# Altium PCB PCB_HDMI_To_FPC-v1.0.PcbDoc (part 1 of 3)
Units mil, origin at the board's own origin, x right, y up, seen from the top; angles counter-clockwise.
Board outline 2043 x 1400 mil, 2 copper layers (Top Layer, Bottom Layer), stack 61.811 mil thick; 121 components, 92 nets, 483 pads, 226 vias.
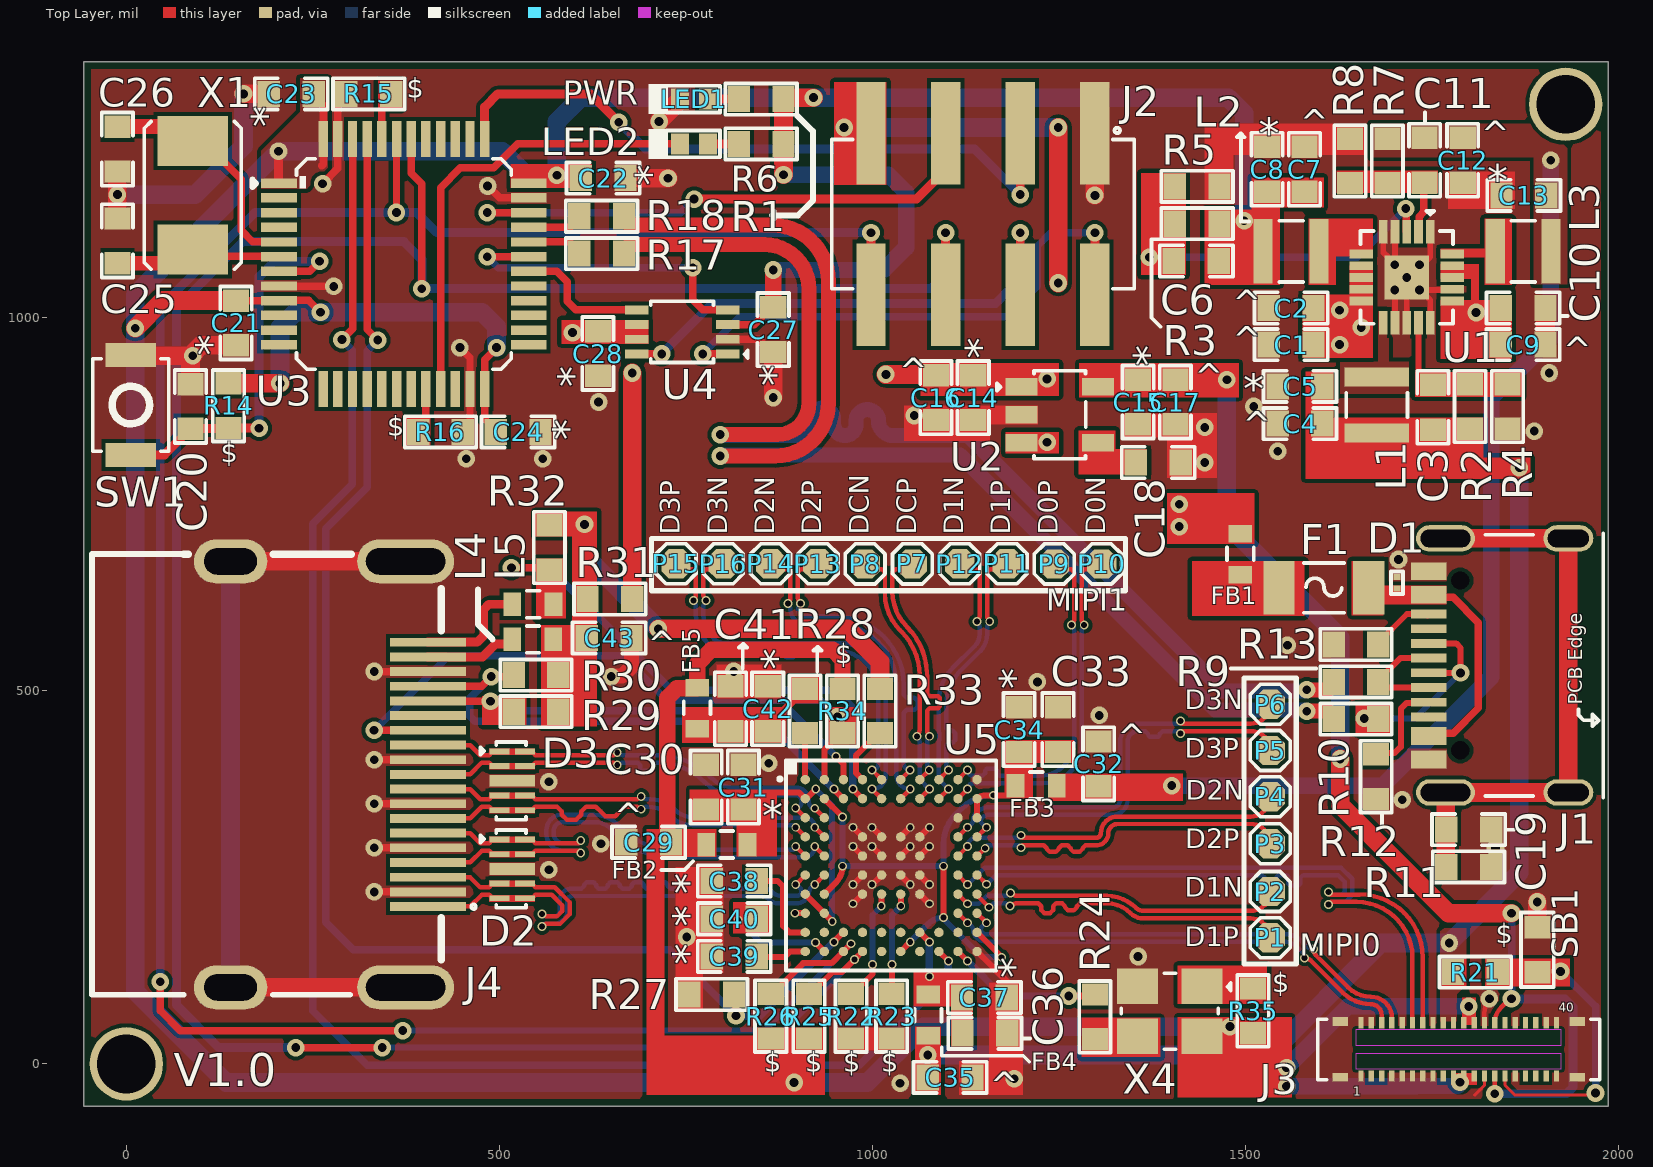
[diagram p0: Top Layer view]
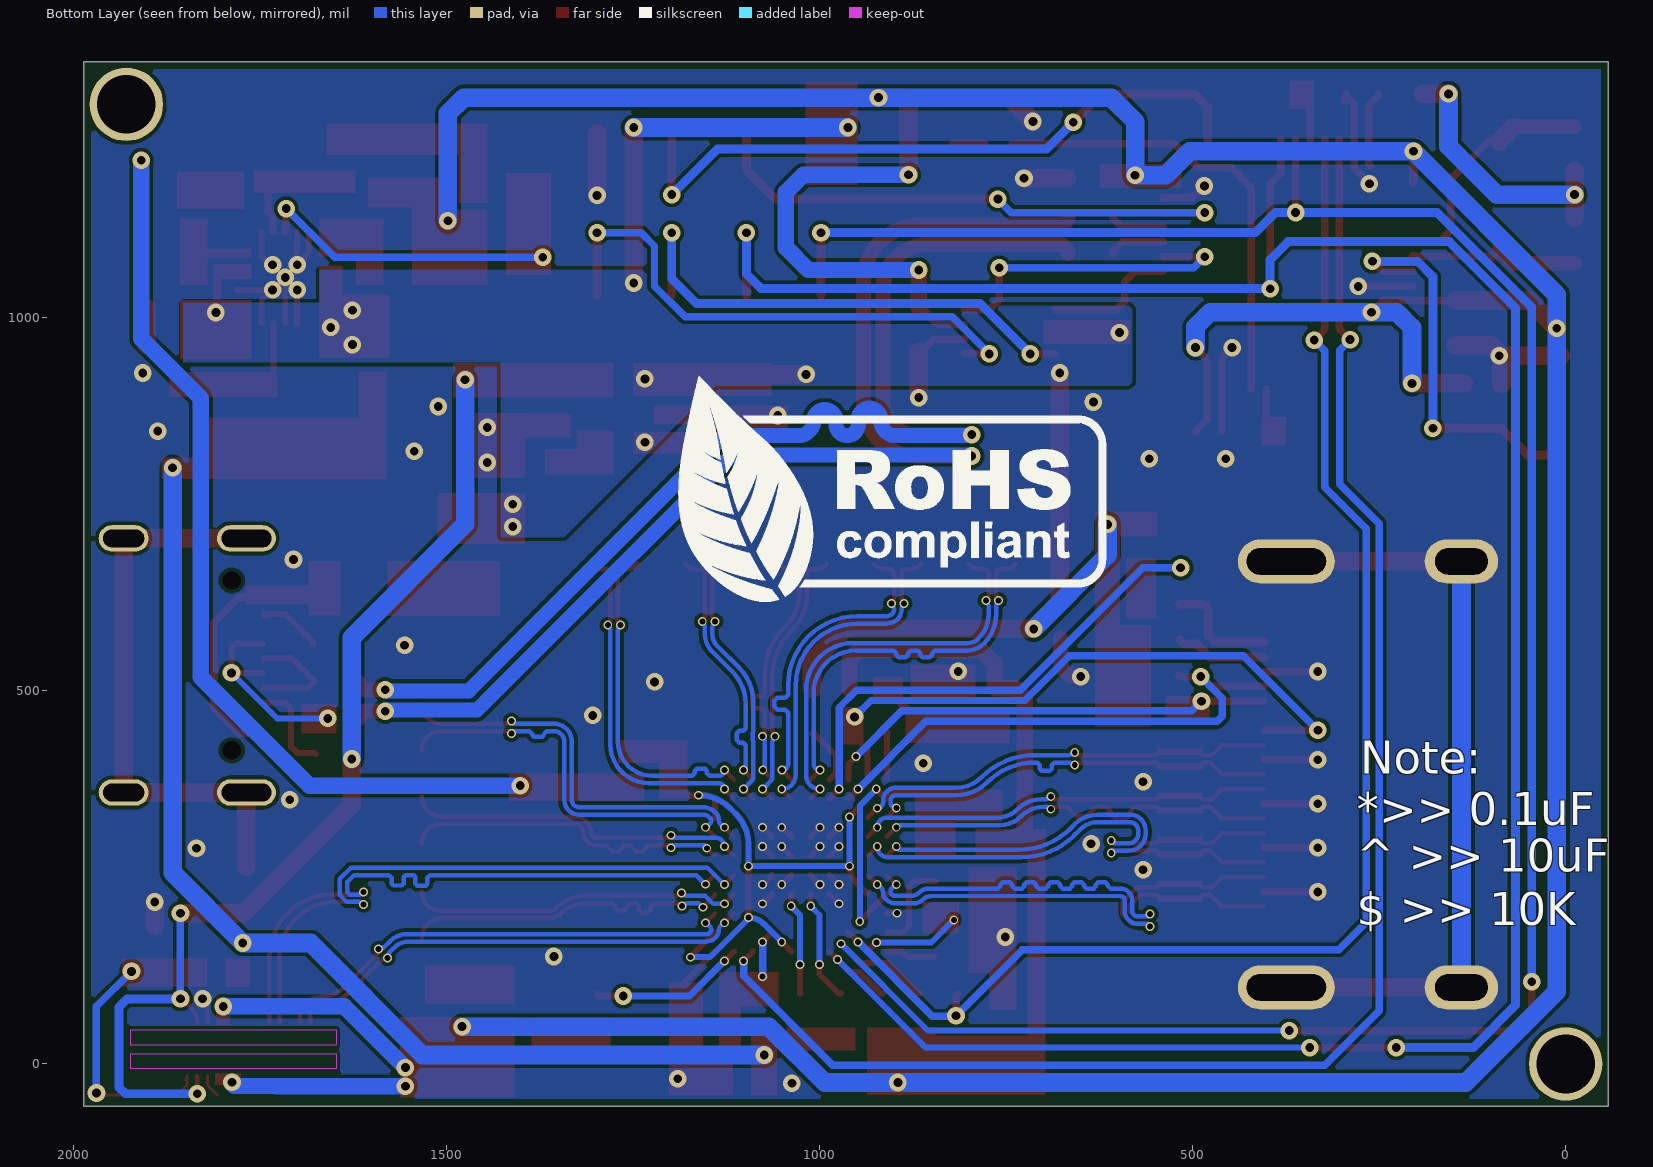
[diagram p1: Bottom Layer view, seen from below]
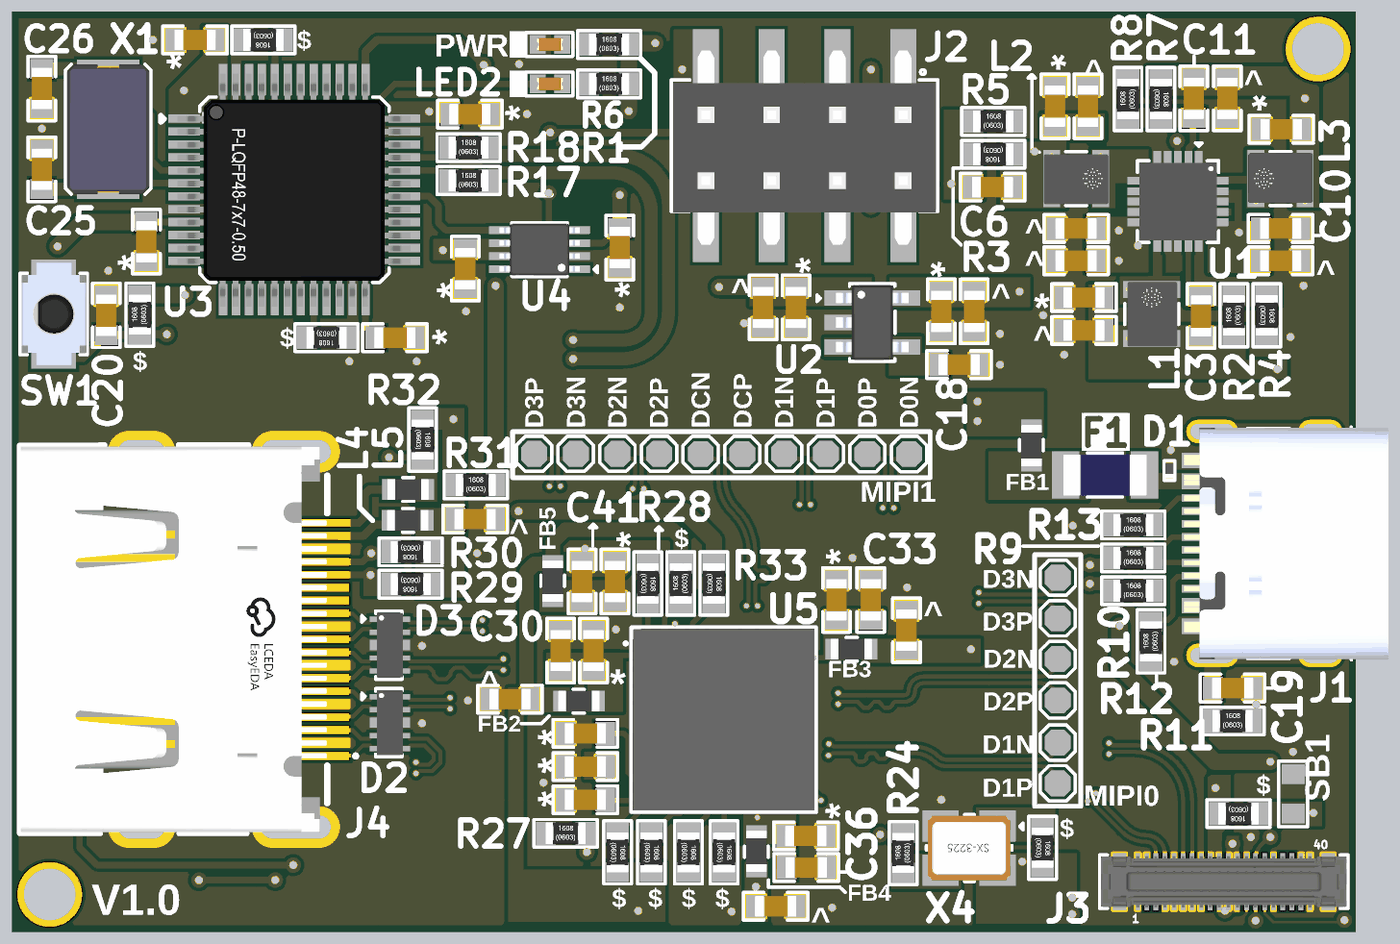
[diagram p3: 3D render of the assembled board from above, using the file's embedded part models]

## Layer stack, top to bottom
Top Solder: solder mask 0.394, Solder Resist, Dk 3.5
Top Layer: signal copper 1.378
Core: core 59.055, FR-4, Dk 4.8
Bottom Layer: signal copper 1.378
Bottom Solder: solder mask 0.394, Solder Resist, Dk 3.5

## Board outline
-57,-57 -57,1343 1986,1343 1986,-57

## Design rules (kind name [scope] priority, off if disabled: settings)
BoardOutlineClearance [All] p1: gap=0 ignorepadtopadclearanceinfootprint=FALSE except(10: Poly-OutlineEdge)
Clearance [All] p1: gap=5 ignorepadtopadclearanceinfootprint=FALSE except(3.5: SMDPad-SMDPad; 4: Arc-Arc Arc-Track Arc-SMDPad Arc-Via Track-Track Track-SMDPad Track-Via; 7: Arc-THPad Arc-Text Track-THPad Track-Text SMDPad-Text THPad-THPad THPad-Via THPad-Text Via-Text Fill-Text Poly-Text Region-Text Text-Text)
ComponentClearance [All] p1: gap=3 collisioncheckmode=3 verticalgap=3 showdistances=FALSE
DiffPairsRouting DiffPairsRouting_HDMI [InDifferentialPairClass('HDMI_Lines')] p1: maxlimit=4 minlimit=4 mostfreqgap=4 toplayer_minwidth=6 toplayer_maxwidth=6 toplayer_prefwidth=6 bottomlayer_minwidth=6 bottomlayer_maxwidth=6 bottomlayer_prefwidth=6 impedanceprofiledriven=TRUE impedanceprofileid={F10A205E-B23D-4947-85CF-815778E6CB3A} impedanceprofilevalue=100.000000 maxuncoupledlength=500
DiffPairsRouting DiffPairsRouting_MIPI [InDifferentialPairClass('MIPI_Lines')] p2: maxlimit=4 minlimit=4 mostfreqgap=4 toplayer_minwidth=6 toplayer_maxwidth=6 toplayer_prefwidth=6 bottomlayer_minwidth=6 bottomlayer_maxwidth=6 bottomlayer_prefwidth=6 impedanceprofiledriven=TRUE impedanceprofileid={F10A205E-B23D-4947-85CF-815778E6CB3A} impedanceprofilevalue=100.000000 maxuncoupledlength=500
DiffPairsRouting DiffPairsRouting_USB [InDifferentialPairClass('USB_Lines')] p3: maxlimit=6 minlimit=6 mostfreqgap=6 toplayer_minwidth=20 toplayer_maxwidth=20 toplayer_prefwidth=20 bottomlayer_minwidth=20 bottomlayer_maxwidth=20 bottomlayer_prefwidth=20 impedanceprofiledriven=TRUE impedanceprofileid={84B6C6F7-BC67-4999-83A6-74B9FB0A56AE} impedanceprofilevalue=90.000000 maxuncoupledlength=500
HoleSize [All] p1: absolutevalues=TRUE maxlimit=1000 minlimit=1 maxpercent=80.000 minpercent=20.000
HoleToHoleClearance [All] p1: gap=1 allowstackedmicrovias=TRUE
MatchedLengths "Schematic Matched Net Lengths_3" [InNetClass('HDMI')] p1: tolerance=5 checknetsindiffpair=TRUE checkdiffpairvsdiffpair=FALSE checkxsignals=FALSE checkothers=FALSE
MatchedLengths "Schematic Matched Net Lengths_2" [InNetClass('MIPI')] p2: tolerance=15 checknetsindiffpair=TRUE checkdiffpairvsdiffpair=FALSE checkxsignals=FALSE checkothers=FALSE
MatchedLengths "Schematic Matched Net Lengths" [InNetClass('USB')] p3: tolerance=50 checknetsindiffpair=TRUE checkdiffpairvsdiffpair=FALSE checkxsignals=FALSE checkothers=FALSE
MaxMinImpedance "Schematic Impedance Constraint_3" [InNetClass('HDMI')] p1: minimum=95.00 maximum=100.0
MaxMinImpedance "Schematic Impedance Constraint_2" [InNetClass('MIPI')] p2: minimum=95.00 maximum=100.0
MaxMinImpedance "Schematic Impedance Constraint" [InNetClass('USB')] p3: minimum=85.00 maximum=90.00
MinimumSolderMaskSliver [All] p1: minsoldermaskwidth=1
PolygonConnect [All] p1: connectstyle=Direct reliefconductorwidth=10 reliefentries=4 polygonreliefangle="90 Angle" airgapwidth=10
RoutingVias [All] p1: holewidth=11.81 width=23.62 viastyle="Through Hole" minholewidth=7.87 minwidth=11.81 maxholewidth=11.81 maxwidth=23.62
SilkToSilkClearance [All] p1: silktosilkclearance=0
SilkToSolderMaskClearance [IsPad] p1: minsilkscreentomaskgap=0 clearancetoexposedcopper=TRUE
SolderMaskExpansion SolderMaskExpansion_1 [IsVia] p1: expansion=4 istentingtop=TRUE
SolderMaskExpansion [Not IsVia] p2: expansion=4 istentingtop=FALSE
UnRoutedNet [All] p1: checkbadconnections=TRUE
Width [All] p1: maxlimit=100 minlimit=4 preferedwidth=10 minimp=50.000000 maximp=50.000000 favimp=50.000000
22 further rules are at their usual default settings.

## Classes and differential pairs
differential pair class MIPI_Lines: MIPI0_D0 MIPI0_D1 MIPI0_D2 MIPI0_D3 MIPI0_DC MIPI1_D0 MIPI1_D1 MIPI1_D2 MIPI1_D3 MIPI1_DC
differential pair class HDMI_Lines: HDMIC HDMID0 HDMID1 HDMID2
net class MIPI: MIPI0_D0_N MIPI0_D0_P MIPI0_D1_N MIPI0_D1_P MIPI0_D2_N MIPI0_D2_P MIPI0_D3_N MIPI0_D3_P MIPI0_DC_N MIPI0_DC_P MIPI1_D0_N MIPI1_D0_P MIPI1_D1_N MIPI1_D1_P MIPI1_D2_N MIPI1_D2_P MIPI1_D3_N MIPI1_D3_P MIPI1_DC_N MIPI1_DC_P
net class HDMI: HDMIC_N HDMIC_P HDMID0_N HDMID0_P HDMID1_N HDMID1_P HDMID2_N HDMID2_P
differential pair class USB_Lines: USB
net class USB: USB_N USB_P
component class U_Power_Section: C1 C2 C3 C4 C5 C6 C7 C8 C9 C10 C11 C12 C13 C14 C15 C16 C17 C18 C19 D1 F1 FB1 J1 L1 L2 L3 LED1 LED2 R1 R2 R3 R4 R5 R6 R7 R8 R9 R10 R11 R12 R13 U1 U2
component class U_HDMI_to_MIPI_Section: C29 C30 C31 C32 C33 C34 C35 C36 C37 C38 C39 C40 C41 C42 FB2 FB3 FB4 FB5 J3 P1 P2 P3 P4 P5 P6 P7 P8 P9 P10 P11 P12 P13 P14 P15 P16 R21 R22 R23 R24 R25 R26 R27 R28 R34 R35 SB1 U5 X4
component class U_Controller_Section: C20 C21 C22 C23 C24 C25 C26 C27 C28 J2 R14 R15 R16 R17 R18 SW1 U3 U4 X1
component class U_Connector_Section: C43 D2 D3 J4 L4 L5 R29 R30 R31 R32 R33
differential pair HDMID2: +HDMID2_P -HDMID2_N
differential pair MIPI1_DC: +MIPI1_DC_P -MIPI1_DC_N
differential pair MIPI1_D3: +MIPI1_D3_P -MIPI1_D3_N
differential pair MIPI1_D2: +MIPI1_D2_P -MIPI1_D2_N
differential pair MIPI1_D1: +MIPI1_D1_P -MIPI1_D1_N
differential pair MIPI1_D0: +MIPI1_D0_P -MIPI1_D0_N
differential pair MIPI0_DC: +MIPI0_DC_P -MIPI0_DC_N
differential pair MIPI0_D3: +MIPI0_D3_P -MIPI0_D3_N
differential pair MIPI0_D2: +MIPI0_D2_P -MIPI0_D2_N
differential pair MIPI0_D1: +MIPI0_D1_P -MIPI0_D1_N
differential pair MIPI0_D0: +MIPI0_D0_P -MIPI0_D0_N
differential pair HDMID1: +HDMID1_P -HDMID1_N
differential pair HDMID0: +HDMID0_P -HDMID0_N
differential pair HDMIC: +HDMIC_P -HDMIC_N
differential pair USB: +USB_P -USB_N

## Components (designator, comment, footprint, x,y, rotation, side; value= is the part's Value field where it differs from the comment)
C1 "10uF" Cap-0603 1561,964 r0 top locked
C2 "10uF" Cap-0603 1561,1013 r0 top locked
C3 "220pF" Cap-0603 1751,880 r270 top locked
C4 "10uF" Cap-0603 1573,858 r0 top locked
C5 "100nF" Cap-0603 1573,908 r0 top locked
C6 "220pF" Cap-0603 1434,1076 r0 top locked
C7 "10uF" Cap-0603 1579,1199 r270 top locked
C8 "100nF" Cap-0603 1529,1199 r270 top locked
C9 "10uF" Cap-0603 1872,964 r180 top locked
C10 "1uF" Cap-0603 1872,1013 r180 top locked
C11 "220pF" Cap-0603 1740,1211 r90 top locked
C12 "10uF" Cap-0603 1791,1211 r90 top locked
C13 "100nF" Cap-0603 1873,1164 r0 top locked
C14 "100nF" Cap-0603 1135,893 r270 top locked
C15 "100nF" Cap-0603 1356,887 r90 top locked
C16 "10uF" Cap-0603 1085,893 r270 top locked
C17 "10uF" Cap-0603 1406,887 r90 top locked
C18 "22nF" Cap-0603 1383,806 r180 top locked
C19 "4.7nF" Cap-0603 1799,314 r180 top locked
C20 "1uF" Cap-0603 86,881 r90 top locked
C21 "100nF" Cap-0603 147,993 r90 top locked
C22 "100nF" Cap-0603 639,1187 r180 top locked
C23 "100nF" Cap-0603 221,1300 r0 top locked
C24 "100nF" Cap-0603 525,847 r180 top locked
C25 "20pF" Cap-0603 -12,1103 r270 top locked
C26 "20pF" Cap-0603 -12,1226 r90 top locked
C27 "100nF" Cap-0603 867,984 r270 top locked
C28 "100nF" Cap-0603 632,952 r270 top locked
C29 "10uF" Cap-0603 700,297 r0 top locked
C30 "10nF" Cap-0603 777,371 r270 top locked
C31 "100nF" Cap-0603 827,371 r270 top locked
C32 "10uF" Cap-0603 1303,402 r270 top locked
C33 "10nF" Cap-0603 1248.64,448.05 r270 top locked
C34 "100nF" Cap-0603 1196.64,448.05 r270 top locked
C35 "10uF" Cap-0603 1104,-18 r180 top locked
C36 "10nF" Cap-0603 1150.64,41.05 r180 top locked
C37 "100nF" Cap-0603 1150,89 r180 top locked
C38 "100nF" Cap-0603 814.64,245.05 r0 top locked
C39 "100nF" Cap-0603 814.64,144.05 r0 top locked
C40 "100nF" Cap-0603 814.64,194.55 r0 top locked
C41 "10nF" Cap-0603 809.64,476.05 r270 top locked
C42 "100nF" Cap-0603 859.64,476.05 r270 top locked
C43 "10uF" Cap-0603 647,571 r180 top locked
D1 "PESD5V0H1BSFYL" DSN0603-2 1703,644.87 r90 top locked
D2 "AZ1045-04F" AZ1045-04F 517.22,261.31 r0 top locked
D3 "AZ1045-04F" AZ1045-04F 517.22,379.31 r0 top locked
F1 "1206L300SLTHYR" "Fuse 1206 (3216 Metric)" 1605,638 r180 top locked
FB1 "120R" "IND-0603 (1608 Metric)" 1493,683 r90 top
FB2 "120R" "IND-0603 (1608 Metric)" 805,294 r180 top locked
FB3 "120R" "IND-0603 (1608 Metric)" 1219.2,373.05 r0 top locked
FB4 "120R" "IND-0603 (1608 Metric)" 1074.64,65.49 r270 top locked
FB5 "120R" "IND-0603 (1608 Metric)" 765,476.56 r90 top locked
J1 "TYPE-C-31-M-12" TYPE-C-31-M-12_ 1839,534 r90 top locked
J2 "2.54-2*4P" C192300 1148,1139 r270 top locked
J3 "BM23FR0.6-40DS-0.35V(895)" BM23FR0.6-40DS-0.35V(895) 1785.66,19.4 r0 top
J4 "HD-A-05H9191N" HD-A-05H9191N 272,388 r270 top locked
L1 "1.5uH" "IND-1008 (2520 Metric)" 1676,883 r270 top locked
L2 "1.5uH" "IND-1008 (2520 Metric)" 1561,1089 r180 top locked
L3 "1.5uH" "IND-1008 (2520 Metric)" 1872,1089 r0 top locked
L4 "10uH" "IND-0603 (1608 Metric)" 544.56,569 r0 top locked
L5 "10uH" "IND-0603 (1608 Metric)" 545,616 r0 top locked
LED1 "Green" LED-0402 760.7,1293 r180 top locked
LED2 "Green" LED-0402 760.7,1233 r180 top locked
P1 "TEST POINT" "Test-point - 0.5mm" 1533,169 r90 top locked
P2 "TEST POINT" "Test-point - 0.5mm" 1533,231 r90 top locked
P3 "TEST POINT" "Test-point - 0.5mm" 1533.09,295 r180 top locked
P4 "TEST POINT" "Test-point - 0.5mm" 1533.09,358 r180 top locked
P5 "TEST POINT" "Test-point - 0.5mm" 1533.02,420 r0 top locked
P6 "TEST POINT" "Test-point - 0.5mm" 1533.09,482 r0 top locked
P7 "TEST POINT" "Test-point - 0.5mm" 1053.46,670 r90 top locked
P8 "TEST POINT" "Test-point - 0.5mm" 990.07,670 r90 top locked
P9 "TEST POINT" "Test-point - 0.5mm" 1243.61,670 r90 top locked
P10 "TEST POINT" "Test-point - 0.5mm" 1307,670 r90 top locked
P11 "TEST POINT" "Test-point - 0.5mm" 1180.32,670.16 r0 top locked
P12 "TEST POINT" "Test-point - 0.5mm" 1116.94,670.16 r0 top locked
P13 "TEST POINT" "Test-point - 0.5mm" 926.78,670.16 r0 top locked
P14 "TEST POINT" "Test-point - 0.5mm" 863.39,670.16 r0 top locked
P15 "TEST POINT" "Test-point - 0.5mm" 736.69,670.2 r180 top locked
P16 "TEST POINT" "Test-point - 0.5mm" 800.08,670.2 r180 top locked
R1 "1K" Res-0603 850.7,1293 r180 top locked
R2 "200K" Res-0603 1801,881 r270 top locked
R3 "68K" RES-0603 1435,1126 r0 top locked
R4 "100K" Res-0603 1851,881 r90 top locked
R5 "15K" RES-0603 1435,1176 r180 top locked
R6 "1K" Res-0603 850.7,1233 r180 top locked
R7 "120K" RES-0603 1690,1210 r90 top locked
R8 "100K" Res-0603 1640,1210 r270 top locked
R9 "0R" Res-0603 1648,512 r180 top locked
R10 "0R" Res-0603 1648,462 r180 top locked
R11 "1M" Res-0603 1799,264 r180 top locked
R12 "5.1k" Res-0603 1675,385 r270 top locked
R13 "5.1k" Res-0603 1648,562 r180 top locked
R14 "10K" Res-0603 137,882 r270 top locked
R15 "10K" Res-0603 325,1300 r0 top locked
R16 "10K" Res-0603 421,847 r0 top locked
R17 "22R" Res-0603 637,1086 r180 top locked
R18 "22R" Res-0603 637,1136 r180 top locked
R21 "10K" Res-0603 1808,123 r0 top locked
R22 "10K" Res-0603 971.3,64.05 r90 top locked
R23 "10K" Res-0603 1025.64,64.05 r90 top locked
R24 "1K" Res-0603 1298,63 r270 top locked
R25 "10K" Res-0603 914.97,64.05 r90 top locked
R26 "10K" Res-0603 863.64,64.05 r90 top locked
R27 "47K" Res-0603 784.64,93.05 r180 top locked
R28 "2K" Res-0603 909.64,473 r90 top locked
R29 "47K" Res-0603 549,472 r0 top locked
R30 "47K" Res-0603 549,521 r0 top locked
R31 "1K" Res-0603 648,623 r180 top locked
R32 "1K" Res-0603 567,692 r90 top locked
R33 "1K" Res-0603 1010,473 r90 top locked
R34 "10K" Res-0603 959.82,473 r270 top locked
R35 "10K" Res-0603 1510,71 r90 top locked
SB1 "Solder Bridge 0603" "Solder Bridge" 1891,153 r270 top locked
SW1 "B3U-1000P" B3U-1000P 6,883 r90 top locked
U1 "EA3036CQBR" 20-QFN(3X3) 1716,1054 r270 top locked
U2 "RT9193-28GB" SOT-23-5 1251,870 r0 top locked
U3 "STM32F103CBT6" "48-LQFP (7x7)_" 372,1072 r0 top locked
U4 "TXB0102DCUR" VSSOP-8(3.1x2.1) 745,981 r180 top locked
U5 "TC358870XBG(NOK)" TC358870XBG 1025.02,265.84 r0 top locked
X1 "8MHz" SMD5032-2P 89,1164 r270 top locked
X4 "40MHz" SMD3225-4P 1398.31,70.46 r180 top locked value=40MHZ

## Footprints (in the part's own frame and the unit in brackets; to place one, negate y for a bottom-side part, rotate by r counter-clockwise, add the part's x,y. Pads: shape width x height; smd on the part's side, far side on the other; paste and mask are expansions set on the pad)
20-QFN(3X3) [mm]
  rect 0.8x0.3 smd: 1(-1.55,0.8) 2(-1.55,0.4) 3(-1.55,0) 4(-1.55,-0.4) 5(-1.55,-0.8) 11(1.55,-0.8) 12(1.55,-0.4) 13(1.55,0) 14(1.55,0.4) 15(1.55,0.8)
  rect 0.3x0.8 smd: 6(-0.8,-1.55) 7(-0.4,-1.55) 8(0,-1.55) 9(0.4,-1.55) 10(0.8,-1.55) 16(0.8,1.55) 17(0.4,1.55) 18(0,1.55) 19(-0.4,1.55) 20(-0.8,1.55)
  rect 1.5x1.5 smd: 21(0,0)
  silkscreen extent -2.26,-1.57 1.58,1.57, body extent -1.5,-1.5 1.5,1.5, height 0.8
"48-LQFP (7x7)_" [mm]
  rect 1.22x0.32 smd: 1(-4.25,2.75) 2(-4.25,2.25) 3(-4.25,1.75) 4(-4.25,1.25) 5(-4.25,0.75) 6(-4.25,0.25) 7(-4.25,-0.25) 8(-4.25,-0.75) 9(-4.25,-1.25) 10(-4.25,-1.75) 11(-4.25,-2.25) 12(-4.25,-2.75) 25(4.25,-2.75) 26(4.25,-2.25) 27(4.25,-1.75) 28(4.25,-1.25) 29(4.25,-0.75) 30(4.25,-0.25) 31(4.25,0.25) 32(4.25,0.75) 33(4.25,1.25) 34(4.25,1.75) 35(4.25,2.25) 36(4.25,2.75)
  rect 0.32x1.22 smd: 13(-2.75,-4.25) 14(-2.25,-4.25) 15(-1.75,-4.25) 16(-1.25,-4.25) 17(-0.75,-4.25) 18(-0.25,-4.25) 19(0.25,-4.25) 20(0.75,-4.25) 21(1.25,-4.25) 22(1.75,-4.25) 23(2.25,-4.25) 24(2.75,-4.25) 37(2.75,4.25) 38(2.25,4.25) 39(1.75,4.25) 40(1.25,4.25) 41(0.75,4.25) 42(0.25,4.25) 43(-0.25,4.25) 44(-0.75,4.25) 45(-1.25,4.25) 46(-1.75,4.25) 47(-2.25,4.25) 48(-2.75,4.25)
  silkscreen extent -5.16,-3.58 3.66,3.58, body extent -4.51,-4.51 4.49,4.49, height 1.43
AZ1045-04F [mm]
  rect 0.675x0.2 smd: 1(-0.437,1) 2(-0.437,0.5) 4(-0.437,-0.5) 5(-0.437,-1) 6(0.437,-1) 6(0.437,-1) 7(0.437,-0.5) 9(0.437,0.5) 10(0.437,1)
  rect 1.55x0.4 smd: 3_8(0,0)
  silkscreen extent -1.08,-1.32 0.47,1.32, body extent -0.5,-1.25 0.5,1.25, height 0.55
B3U-1000P [mm] "SWITCH TACTILE SPST-NO 0.05A 12V"
  rect 0.82x1.72 smd: 1(-1.7,0) 2(1.7,0)
  silkscreen extent -1.57,-1.3 1.57,1.3, body extent -2,-1.26 2,1.24, height 1.6
BM23FR0.6-40DS-0.35V(895) [mm]
  rect 0.18x0.38 smd mask+0.07: 1(-3.325,-0.91) 2(-3.325,0.91) 3(-2.975,-0.91) 4(-2.975,0.91) 5(-2.625,-0.91) 6(-2.625,0.91) 7(-2.275,-0.91) 8(-2.275,0.91) 9(-1.925,-0.91) 10(-1.925,0.91) 11(-1.575,-0.91) 12(-1.575,0.91) 13(-1.225,-0.91) 14(-1.225,0.91) 15(-0.875,-0.91) 16(-0.875,0.91) 17(-0.525,-0.91) 18(-0.525,0.91) 19(-0.175,-0.91) 20(-0.175,0.91) 21(0.175,-0.91) 22(0.175,0.91) 23(0.525,-0.91) 24(0.525,0.91) 25(0.875,-0.91) 26(0.875,0.91) 27(1.225,-0.91) 28(1.225,0.91) 29(1.575,-0.91) 30(1.575,0.91) 31(1.925,-0.91) 32(1.925,0.91) 33(2.275,-0.91) 34(2.275,0.91) 35(2.625,-0.91) 36(2.625,0.91) 37(2.975,-0.91) 38(2.975,0.91) 39(3.325,-0.91) 40(3.325,0.91)
  rect 0.52x0.3 smd mask+0.07: S1(-4.03,-0.95) S2(-4.03,0.95) S3(4.03,0.95) S4(4.03,-0.95)
  Keep-Out Layer region: -3.503,-0.665 3.497,-0.665 3.497,-0.145 -3.503,-0.145
  Keep-Out Layer region: -3.503,0.145 3.497,0.145 3.497,0.665 -3.503,0.665
  silkscreen extent -4.8,-1.03 4.8,1.03, body extent -4.75,-0.99 4.75,0.99, height 0.6
C192300 [mm]
  rect 3.5x1 smd: 1(-2.75,3.81) 2(2.75,3.81) 3(-2.75,1.27) 4(2.75,1.27) 5(-2.75,-1.27) 6(2.75,-1.27) 7(-2.75,-3.81) 8(2.75,-3.81)
  silkscreen extent -2.94,-5.15 2.54,5.15, body extent -3.67,-5.08 3.83,5.08, height 8.5
Cap-0603 [mil]
  rect 30x35 smd mask+2.36: 1(-30,0) 2(30,0)
  silkscreen extent -49,-21 49,21, body extent -32,-16 31,16, height 34
DSN0603-2 [mm]
  rect 0.2x0.24 smd mask+0.055: 1(-0.2,0) 2(0.2,0)
  silkscreen extent -0.38,-0.2 0.38,0.2, body extent -0.3,-0.15 0.3,0.15, height 0.32
"Fuse 1206 (3216 Metric)" [mm] "0.126\" L x 0.062\" W x 0.026\" H (3.20mm x 1.58mm x 0.65mm)"
  rect 1.06x1.82 smd: 1(-1.528,0) 2(1.528,0)
  silkscreen extent -0.68,-0.85 0.68,0.85, body extent -1.6,-0.79 1.6,0.79, height 0.85
HD-A-05H9191N [mm]
  rect 0.3x2.6 smd paste-100 mask+0.051: 1(4.501,3.36) 2(4.001,3.36) 3(3.501,3.36) 4(3.001,3.36) 5(2.5,3.36) 6(2,3.36) 7(1.5,3.36) 8(1,3.36) 9(0.5,3.36) 10(0,3.36) 11(-0.5,3.36) 12(-1,3.36) 13(-1.5,3.36) 14(-2,3.36) 15(-2.5,3.36) 16(-3.001,3.36) 17(-3.501,3.36) 18(-4.001,3.36) 19(-4.501,3.36)
  oval 1.5x3.3 hole 0.9 slot 2.7 at 90 deg paste+0 mask+0.051: S1(-7.251,2.6) S2(7.251,2.6)
  oval 1.5x2.5 hole 0.9 slot 1.8 at 90 deg paste+0 mask+0.051: S3(7.251,-3.36) S4(-7.251,-3.36)
  silkscreen extent -7.5,-8.07 7.5,4.98, body extent -7.45,-8.03 7.45,3.77, height 6.19
"IND-0603 (1608 Metric)" [mm] "0.063\" L x 0.032\" W (1.60mm x 0.80mm)"
  rect 0.6x0.8 smd: 1(-0.7,0) 2(0.7,0)
  silkscreen extent -0.2,-0.46 0.23,0.46, body extent -0.8,-0.4 0.8,0.4, height 0.78
"IND-1008 (2520 Metric)" [mm]
  rect 0.65x2.2 smd: 1(-0.95,0) 2(0.95,0)
  silkscreen extent -0.41,-1.04 0.41,1.04, body extent -1.25,-1 1.25,1, height 1.2
LED-0402 [mm]
  rect 0.62x0.72 smd: 1(-0.475,0) 2(0.475,0)
  silkscreen extent -0.89,-0.51 1.55,0.51, body extent -0.5,-0.25 0.51,0.25, height 0.45
Res-0603 [mil]
  rect 30x35 smd: 1(-30,0) 2(30,0)
  silkscreen extent -48,-21 48,21, body extent -31,-17 31,17, height 18
RES-0603 [mil]
  rect 30x35 smd: 1(-30,0) 2(30,0)
  silkscreen extent -48,-21 48,21, body extent -31,-17 31,17, height 18
SMD3225-4P [mm]
  rect 1.4x1.2 smd: 1(-1.1,-0.85) 2(1.1,-0.85) 3(1.1,0.85) 4(-1.1,0.85)
  silkscreen extent -2.08,-1.3 1.65,1.3, body extent -1.6,-1.25 1.6,1.25, height 0.81
SMD5032-2P [mm]
  rect 1.7x2.4 smd: 1(-1.85,0) 2(1.85,0)
  silkscreen extent -2.51,-1.65 2.51,1.65, body extent -2.5,-1.6 2.5,1.6, height 1.3
"Solder Bridge" [mil] "Solder Bridge ON"
  rect 30x35 smd: 1(-30,0) 2(30,0)
  silkscreen extent -50,-22 50,22
SOT-23-5 [mm]
  rect 1.1x0.6 smd: 1(-1.3,0.95) 2(-1.3,0) 3(-1.3,-0.95) 4(1.3,-0.95) 5(1.3,0.95)
  silkscreen extent -2.13,-1.5 0.88,1.5, body extent -1.4,-1.45 1.4,1.45, height 1.45
TC358870XBG [mm]
  round 0.32 smd paste+0 mask+0.05: A1(-2.925,2.925) A2(-2.275,2.925) A3(-1.625,2.925) A4(-0.975,2.925) A5(-0.325,2.925) A6(0.325,2.925) A7(0.975,2.925) A8(1.625,2.925) A9(2.275,2.925) A10(2.925,2.925) B1(-2.925,2.275) B2(-2.275,2.275) B3(-1.625,2.275) B4(-0.975,2.275) B5(-0.325,2.275) B6(0.325,2.275) B7(0.975,2.275) B8(1.625,2.275) B9(2.275,2.275) B10(2.925,2.275) C1(-2.925,1.625) C2(-2.275,1.625) C9(2.275,1.625) C10(2.925,1.625) D1(-2.925,0.975) D2(-2.275,0.975) D4(-0.975,0.975) D5(-0.325,0.975) D6(0.325,0.975) D7(0.975,0.975) D9(2.275,0.975) D10(2.925,0.975) E1(-2.925,0.325) E2(-2.275,0.325) E4(-0.975,0.325) E5(-0.325,0.325) E6(0.325,0.325) E7(0.975,0.325) E9(2.275,0.325) E10(2.925,0.325) F1(-2.925,-0.325) F2(-2.275,-0.325) F4(-0.975,-0.325) F5(-0.325,-0.325) F6(0.325,-0.325) F7(0.975,-0.325) F9(2.275,-0.325) F10(2.925,-0.325) G1(-2.925,-0.975) G2(-2.275,-0.975) G4(-0.975,-0.975) G5(-0.325,-0.975) G6(0.325,-0.975) G7(0.975,-0.975) G9(2.275,-0.975) G10(2.925,-0.975) H1(-2.925,-1.625) H2(-2.275,-1.625) H9(2.275,-1.625) H10(2.925,-1.625) J1(-2.925,-2.275) J2(-2.275,-2.275) J3(-1.625,-2.275) J4(-0.975,-2.275) J5(-0.325,-2.275) J6(0.325,-2.275) J7(0.975,-2.275) J8(1.625,-2.275) J9(2.275,-2.275) J10(2.925,-2.275) K1(-2.925,-2.925) K2(-2.275,-2.925) K3(-1.625,-2.925) K4(-0.975,-2.925) K5(-0.325,-2.925) K6(0.325,-2.925) K7(0.975,-2.925) K8(1.625,-2.925) K9(2.275,-2.925) K10(2.925,-2.925)
  silkscreen extent -3.84,-3.58 3.58,3.58, body extent -3.5,-3.5 3.5,3.5, height 1
"Test-point - 0.5mm" [mm]
  oct 1x1 smd: 1(0,0)
  silkscreen extent -0.68,-0.68 0.68,0.68
TYPE-C-31-M-12_ [mm]
  rect 0.6x1.2 smd: A1/B12(-3.2,2.375) A4/B9(-2.4,2.375) B1/A12(3.2,2.375) B4/A9(2.4,2.375)
  rect 0.3x1.2 smd: A5(-1.25,2.375) A6(-0.25,2.375) A7(0.25,2.375) A8(1.25,2.375) B5(1.75,2.375) B6(0.75,2.375) B7(-0.75,2.375) B8(-1.75,2.375)
  round 0 hole 0.62 unplated: MH(-2.89,1.305) MH(2.89,1.305)
  oval 0.9x2 hole 0.6 slot 1.7 at 90 deg: S1(4.325,1.805) S4(-4.325,1.805)
  oval 0.9x1.7 hole 0.6 slot 1.4 at 90 deg: S2(4.325,-2.375) S3(-4.325,-2.375)
  silkscreen extent -4.5,-3.57 4.5,0.44, body extent -4.47,-5.01 4.47,2.89, height 3.31
VSSOP-8(3.1x2.1) [mm]
  rect 0.8x0.3 smd: 1(-1.55,0.75) 2(-1.55,0.25) 3(-1.55,-0.25) 4(-1.55,-0.75) 5(1.55,-0.75) 6(1.55,-0.25) 7(1.55,0.25) 8(1.55,0.75)
  silkscreen extent -2.24,-1.04 1.07,1.04, body extent -1.55,-1 1.55,1, height 0.88

## Part data
C1 C2 C4 C7 C9 C12 C16 C17 C29 C32 C35 C43: library part CGA0603X5R106K100JT, "10V 10uF X5R ±10% 0603 Multilayer Ceramic Capacitors MLCC - SMD/SMT ROHS", LCSC Part Number=C6119842, Manufacturer=HRE, Package=0603, ComponentLink1Description=LCSC, ComponentLink1URL=https://www.lcsc.com/product-detail/Multilayer-Ceramic-Capacitors-MLCC-SMD-SMT_HRE-CGA0603X5R106K100JT_C6119842.html, Item Type=Capacitor, Manufacturer Part Number=CGA0603X5R106K100JT
C3 C6 C11: library part CS1608X7R221K500NRB, "50V 220pF X7R ±10% 0603 Multilayer Ceramic Capacitors MLCC - SMD/SMT ROHS", LCSC Part Number=C5255295, Manufacturer="Samwha Capacitors", Package=0603, ComponentLink1Description=LCSC, ComponentLink1URL=https://www.lcsc.com/product-detail/Multilayer-Ceramic-Capacitors-MLCC-SMD-SMT_Samwha-Capacitor-CS1608X7R221K500NRB_C5255295.html, Item Type=Capacitor, Manufacturer Part Number=CS1608X7R221K500NRB
C5 C8 C13 C14 C15 C21 C22 C23 C24 C27 C28 C31 C34 C37 C38 C39 C40 C42: library part CL10B104KA8NNNC, "25V 100nF X7R ±10% 0603 Multilayer Ceramic Capacitors MLCC - SMD/SMT ROHS", LCSC Part Number=C1590, Manufacturer="Samsung Electro-Mechanics", Package=0603, ComponentLink1Description=LCSC, ComponentLink1URL=https://www.lcsc.com/product-detail/Multilayer-Ceramic-Capacitors-MLCC-SMD-SMT_Samsung-Electro-Mechanics-CL10B104KA8NNNC_C1590.html, Item Type=Capacitor, Manufacturer Part Number=CL10B104KA8NNNC
C10 C20: library part CL10A105KO8NNNC, "16V 1uF X5R ±10% 0603 Multilayer Ceramic Capacitors MLCC - SMD/SMT ROHS", LCSC Part Number=C1592, Manufacturer="Samsung Electro-Mechanics", Package=0603, ComponentLink1Description=LCSC, ComponentLink1URL=https://www.lcsc.com/product-detail/Multilayer-Ceramic-Capacitors-MLCC-SMD-SMT_Samsung-Electro-Mechanics-CL10A105KO8NNNC_C1592.html, Item Type=Capacitor, Manufacturer Part Number=CL10A105KO8NNNC
C18: library part FN18X223K250PSG, "25V 22nF X7R 0603 Multilayer Ceramic Capacitors MLCC - SMD/SMT ROHS", LCSC Part no=C2929161, Package=0603, ComponentLink1Description=LCSC, ComponentLink1URL=https://www.lcsc.com/product-detail/Multilayer-Ceramic-Capacitors-MLCC-SMD-SMT_PSA-Prosperity-Dielectrics-FN18X223K250PSG_C2929161.html, Item Type=Capacitor, Manfacuturer=PSA, Manufacturer Prt no=FN18X223K250PSG
C19: library part CC0603JRNPO9BN472, "CAP CER 4700PF 50V C0G/NPO 0603", LCSC Part Number=C576818, Manufacturer=Yageo, Supplier Part Number 1=13-CC0603JRNPO9BN472CT-ND, Category="Ceramic Capacitors", ComponentLink1Description=LCSC, ComponentLink1URL=https://www.lcsc.com/product-detail/Multilayer-Ceramic-Capacitors-MLCC-SMD-SMT_YAGEO-CC0603JRNPO9BN472_C576818.html, Item Type=Capacitor, Manufacturer Part Number=CC0603JRNPO9BN472, Pricing 1="1=0.48000, 10=0.33000, 50=0.23100, 100=0.19800, 500=0.14854, 1000=0.12543 (USD)", RoHS=Yes, RoHS Compliant=Yes, Stock 1=31779, Supplier 1=Digi-Key
C25 C26: library part CC0603JRNPO9BN200, "CAP CER 20PF 50V C0G/NPO 0603", Case Code (Imperial)=0603, Case Code (Metric)=1608, Dielectric=C0G, LCSC Part Number=C105621, Manufacturer=Yageo, Max Operating Temperature=125°C, Min Operating Temperature=-55°C, Package Quantity=4000, Supplier Part Number 1=311-1424-6-ND, Tolerance=5%, Voltage Rating=50V, Capacitance=20pF, Case/Package=0603, ComponentLink1Description=http://www.farnell.com/datasheets/1132289.pdf?src-supplier=Element14, ComponentLink1URL=http://www.farnell.com/datasheets/1132289.pdf?src-supplier=Element14, ComponentLink2Description=http://www.yageo.com/documents/recent/UPY-GP_NP0_16V-to-50V_16.pdf?src-supplier=Digi-Key, ComponentLink2URL=http://www.yageo.com/documents/recent/UPY-GP_NP0_16V-to-50V_16.pdf?src-supplier=Digi-Key, Composition=Ceramic, Depth=0.8mm, Item Type=Capacitor, Lead Free="Lead Free", Length=1.6mm, Manufacturer Part Number=CC0603JRNPO9BN200, Mount="Surface Mount", Number of Pins=2, Packaging="Tape and Reel", Pricing 1="1=0.1, 10=0.048, 100=0.0214, 500=0.01526, 1000=0.01198 (USD)", REACH SVHC=Unknown, Stock 1=259568, Supplier 1=Digi-Key, Termination=SMD/SMT, Thickness=0.035inch, Voltage Rating (DC)=50V, Weight=7.1E-05oz, Width=0.8mm
C30 C33 C36 C41: library part FN18X103K500PSG, "50V 10nF X7R ±10% 0603 Multilayer Ceramic Capacitors MLCC - SMD/SMT ROHS", LCSC Part Number=C525264, Manufacturer=PSA, Package=0603, ComponentLink1Description=LCSC, ComponentLink1URL=https://www.lcsc.com/product-detail/Multilayer-Ceramic-Capacitors-MLCC-SMD-SMT_PSA-Prosperity-Dielectrics-FN18X103K500PSG_C525264.html, Item Type=Capacitor, Manufacturer Part Number=FN18X103K500PSG
D1: "TVS DIODE 5VWM 6.3VC DSN0603-2", LCSC Part Number=C477989, Manufacturer=Nexperia, Category="ESD and Circuit Protection ICs", ComponentLink1Description=http://www.farnell.com/datasheets/1961312.pdf?src-supplier=Farnell, ComponentLink1URL=http://www.farnell.com/datasheets/1961312.pdf?src-supplier=Farnell, ComponentLink2Description=https://assets.nexperia.com/documents/data-sheet/PESD5V0H1BSF.pdf?src-supplier=Digi-Key, ComponentLink2URL=https://assets.nexperia.com/documents/data-sheet/PESD5V0H1BSF.pdf?src-supplier=Digi-Key, ComponentLink3Description=http://www.farnell.com/datasheets/1961312.pdf?src-supplier=Newark, ComponentLink3URL=http://www.farnell.com/datasheets/1961312.pdf?src-supplier=Newark, Item Type=Diode, Manufacturer Part Number=PESD5V0H1BSFYL, Pricing 1="18000=0.06453, 36000=0.06278, 54000=0.06104, 90000=0.05930, 180000=0.05755, 900000=0.05581, 1800000=0.05406 (USD)", RoHS=Yes, RoHS Compliant=Yes, Stock 1=9000, Supplier 1=Avnet, Supplier Part Number 1=PESD5V0H1BSFYL
D2 D3: "DFN2510-10 Electrostatic and Surge Protection (TVS/ESD) ROHS", LCSC Part Number=C2987152, Manufacturer="TECH PUBLIC", ComponentLink1Description=LCSC, ComponentLink1URL=https://www.lcsc.com/product-detail/Electrostatic-and-Surge-Protection-TVS-ESD_TECH-PUBLIC-AZ1045-04F_C2987152.html, Item Type=Diode, Manufacturer Part Number=AZ1045-04F
F1: "PTC RESET FUSE 6V 3A 1206", Case Code (Imperial)=1206, Case Code (Metric)=3216, Hold Current=3A, LCSC Part Number=C207041, Manufacturer=Littelfuse, Max Current Rating=50A, Max Operating Temperature=85°C, Max Voltage Rating (DC)=6V, Min Operating Temperature=-40°C, Package Quantity=4000, Power Dissipation=800mW, Resistance=20mR, Trip Current=6A, Approvals=UL,TUV, Case/Package=1206, Category="PTC Resettable Fuses", ComponentLink1Description=https://datasheet.ciiva.com/7438/littelfuse-lorho-ptc-7438567.pdf?src-supplier=Digi-Key, ComponentLink1URL=https://datasheet.ciiva.com/7438/littelfuse-lorho-ptc-7438567.pdf?src-supplier=Digi-Key, ComponentLink2Description=https://datasheet.ciiva.com/7438/littelfuse-lorho-ptc-7438569.pdf?src-supplier=Digi-Key, ComponentLink2URL=https://datasheet.ciiva.com/7438/littelfuse-lorho-ptc-7438569.pdf?src-supplier=Digi-Key, ComponentLink3Description=https://datasheet.ciiva.com/7438/littelfuse-lorho-ptc-7438565.pdf?src-supplier=Digi-Key, ComponentLink3URL=https://datasheet.ciiva.com/7438/littelfuse-lorho-ptc-7438565.pdf?src-supplier=Digi-Key, Item Type=Fuse, Lead Free="Lead Free", Manufacturer Part Number=1206L300SLTHYR, Operating Supply Voltage=6V, Packaging="Tape and Reel", Pricing 1="4000=0.60290 (USD)", RoHS=Yes, RoHS Compliant=Yes, Series="POLY-FUSE®, LoRho™", Stock 1=4000, Supplier 1="Arrow Electronics", Supplier Part Number 1=1206L300SLTHYR, Termination=SMD/SMT, Time to Trip=4s, Voltage Rating (DC)=6V
FB1 FB2 FB3 FB4 FB5: library part BLM18PG121SN1D, "Ferrite Beads Multi-Layer 120Ohm 25% 100MHz 2A 50mOhm DCR 0603 Paper T/R", Case Code (Imperial)=0603, Case Code (Metric)=1608, Current Rating=2A, DC Resistance (DCR)=50mR, Frequency=100MHz, LCSC Part Number=C14709, Manufacturer="Murata Electronics", Max Operating Temperature=125°C, Min Operating Temperature=-55°C, Package Quantity=1, Supplier Part Number=490-1037-1-ND, Tolerance=25%, Case/Package=0603, Category="Ferrite Beads and Chips", ComponentLink1Description=LCSC, ComponentLink1URL=https://www.lcsc.com/product-detail/Ferrite-Beads_Murata-Electronics-BLM18PG121SN1D_C14709.html, ComponentLink2Description=https://datasheet.ciiva.com/5709/1740433-5709171.pdf?src-supplier=Farnell, ComponentLink2URL=https://datasheet.ciiva.com/5709/1740433-5709171.pdf?src-supplier=Farnell, ComponentLink3Description=https://datasheet.ciiva.com/19454/1845013-19454715.pdf?src-supplier=Jameco, ComponentLink3URL=https://datasheet.ciiva.com/19454/1845013-19454715.pdf?src-supplier=Jameco, ComponentLink4Description=https://datasheet.ciiva.com/11799/0900766b81275ca5-11799546.pdf?src-supplier=Rs, ComponentLink4URL=https://datasheet.ciiva.com/11799/0900766b81275ca5-11799546.pdf?src-supplier=Rs, ComponentLink5Description=https://datasheet.ciiva.com/3854/5emiapbde-1-3854039.pdf?src-supplier=Arrow+Electronics, ComponentLink5URL=https://datasheet.ciiva.com/3854/5emiapbde-1-3854039.pdf?src-supplier=Arrow+Electronics, ComponentLink6Description=https://datasheet.ciiva.com/29347/442365-da-01-en-chip-drossel-0603-120r-2000ma-1-6x0-8mm-29347911.pdf?src-supplier=Conrad, ComponentLink6URL=https://datasheet.ciiva.com/29347/442365-da-01-en-chip-drossel-0603-120r-2000ma-1-6x0-8mm-29347911.pdf?src-supplier=Conrad, ComponentLink7Description=https://datasheet.ciiva.com/8021/1740433-8021493.pdf?src-supplier=Element14, ComponentLink7URL=https://datasheet.ciiva.com/8021/1740433-8021493.pdf?src-supplier=Element14, ComponentLink8Description=https://datasheet.ciiva.com/8021/1740433-8021494.pdf?src-supplier=Element14, ComponentLink8URL=https://datasheet.ciiva.com/8021/1740433-8021494.pdf?src-supplier=Element14, ComponentLink9Description=https://datasheet.ciiva.com/14122/blm-series-eng-tds-14122905.pdf?src-supplier=Distrelec, ComponentLink9URL=https://datasheet.ciiva.com/14122/blm-series-eng-tds-14122905.pdf?src-supplier=Distrelec, ComponentLink10Description=https://datasheet.ciiva.com/6212/l0110s0100blm18p-6212502.pdf?src-supplier=Digikey, ComponentLink10URL=https://datasheet.ciiva.com/6212/l0110s0100blm18p-6212502.pdf?src-supplier=Digikey, ComponentLink11Description=https://datasheet.ciiva.com/6212/l0110s0100blm18p-6212504.pdf?src-supplier=Digikey, ComponentLink11URL=https://datasheet.ciiva.com/6212/l0110s0100blm18p-6212504.pdf?src-supplier=Digikey, ComponentLink12Description=https://datasheet.ciiva.com/3081/l0110s0100blm18p-3081632.pdf?src-supplier=Avnet, ComponentLink12URL=https://datasheet.ciiva.com/3081/l0110s0100blm18p-3081632.pdf?src-supplier=Avnet, ComponentLink13Description=https://datasheet.ciiva.com/41449/001172297-da-01-en-drossel-0603-120r-1-6x0-8mm-4000st-41449659.pdf?src-supplier=Conrad, ComponentLink13URL=https://datasheet.ciiva.com/41449/001172297-da-01-en-drossel-0603-120r-1-6x0-8mm-4000st-41449659.pdf?src-supplier=Conrad, Core Material=Ferrite, DC Current=2A, DC Resistance-Max=50mR, Depth=0.8mm, ESR=50mR, Height=0.8mm, Impedance=120R, Item Type="Ferrite Bead", Lead Free="Lead Free", Length=1.6mm, Manufacturer Part Number=BLM18PG121SN1D, Material=Steel,Ferrite, Max Current Rating=2A, Max DC Current=2A, Number of Circuits=1, Number of Lines=1, Package=0603, Packaging="Tape and Reel", Pins=2, Pricing="1=0.1, 10=0.078, 25=0.0712, 50=0.064, 100=0.0469, 250=0.03412, 500=0.03128, 1000=0.02701 (USD)", Radiation Hardening=No, Reach SVHC Compliant=No, RMS Current (Irms)=2A, RoHS=Yes, RoHS Compliant=Yes, Series=BLM18P, Shielding=Unshielded, Stock=1240, Supplier=Digikey, Termination=SMD/SMT, Test Frequency=100MHz, Width=0.8mm
J1: "5A 1 16P Female Type-C SMD USB Connectors ROHS", LCSC Part Number=C165948, Manufacturer="Korean Hroparts Elec", ComponentLink1Description=LCSC, ComponentLink1URL=https://www.lcsc.com/product-detail/USB-Connectors_Korean-Hroparts-Elec-TYPE-C-31-M-12_C165948.html, Item Type="USB Connector", Manufacturer Part Number=TYPE-C-31-M-12
J2: "3A Brick nogging Square Pins 2.5mm 8P 6mm -55℃~+105℃ 2.54mm 双排 Black 2x4P 2.54mm SMD,P=2.54mm Pin Headers ROHS", LCSC Part Number=C192300, Manufacturer="BOOMELE(BOOM Precision Elec)", Package=SMD,P=2.54mm, ComponentLink1Description=LCSC, ComponentLink1URL=https://www.lcsc.com/product-detail/Pin-Headers_BOOMELE-Boom-Precision-Elec-C192300_C192300.html, Item Type=Male, Manufacturer Part Number=2.54-2*4P
J3: "40 Position Straight Type Receptacle Signal Only Board to FPC Connector", Manufacturer=Hirose, Supplier Part Number=798-3FR0640DS035V895, Category=Connectors, ComponentLink1Description=https://www.hirose.com/product/download/?distributor=digikey&amp;type=specSheet&amp;lang=en&amp;num=BM23FR0.6-40DS-0.35V(895)&src-supplier=Digikey, ComponentLink1URL=https://www.hirose.com/product/download/?distributor=digikey&amp;type=specSheet&amp;lang=en&amp;num=BM23FR0.6-40DS-0.35V(895)&src-supplier=Digikey, Item Type=Connector, Manufacturer Part Number=BM23FR0.6-40DS-0.35V(895), Pricing="1=1.5, 10=1.23, 50=1.23, 100=1.06, 1000=0.833, 10000=0.722 (USD)", RoHS=Yes, Stock=1106, Supplier=Mouser
J4: "19P Female HDMI Surface Mount，Right Angle 1 500mA -45℃~+85℃ SMD D-Sub/DVI/HDMI Connectors ROHS", LCSC Part Number=C18213861, Manufacturer=HanElectricity, Package=SMD, ComponentLink1Description=LCSC, ComponentLink1URL=https://www.lcsc.com/product-detail/D-Sub-DVI-HDMI-Connectors_HanElectricity-HD-A-05H9191N_C18213861.html, Item Type=HDMI, Manufacturer Part Number=HD-A-05H9191N
L1 L2 L3: library part LQM2HPN1R5MG0L, "Inductor Power Chip Shielded Multi-Layer 1.5uH 20% 1MHz Ferrite 1.5A 0.088Ohm DCR 1008 T/R", Case Code (Imperial)=1008, Case Code (Metric)=2520, Current Rating=1.5A, DC Resistance (DCR)=88mR, Inductance Tolerance=20%, LCSC Part Number=C98034, Manufacturer="Murata Electronics", Max Operating Temperature=125°C, Min Operating Temperature=-55°C, Package Quantity=1, Self Resonant Frequency=50MHz, Supplier Part Number=490-5113-1-ND, Test Frequency=1MHz, Case/Package=1008, Category="Fixed Inductors", ComponentLink1Description=LCSC, ComponentLink1URL=https://www.lcsc.com/product-detail/Inductors-SMD_Murata-Electronics-LQM2HPN1R5MG0L_C98034.html, ComponentLink2Description=https://datasheet.ciiva.com/30490/0900766b812561d9-30490182.pdf?src-supplier=Rs, ComponentLink2URL=https://datasheet.ciiva.com/30490/0900766b812561d9-30490182.pdf?src-supplier=Rs, ComponentLink3Description=https://datasheet.ciiva.com/1042/l0075s0104lqm2hp-g0-1042938.pdf?src-supplier=Digikey, ComponentLink3URL=https://datasheet.ciiva.com/1042/l0075s0104lqm2hp-g0-1042938.pdf?src-supplier=Digikey, ComponentLink4Description=https://datasheet.ciiva.com/1042/l0075s0104lqm2hp-g0-1042937.pdf?src-supplier=Digikey, ComponentLink4URL=https://datasheet.ciiva.com/1042/l0075s0104lqm2hp-g0-1042937.pdf?src-supplier=Digikey, ComponentLink5Description=https://datasheet.ciiva.com/1042/l0075s0104lqm2hp-g0-1042939.pdf?src-supplier=Digikey, ComponentLink5URL=https://datasheet.ciiva.com/1042/l0075s0104lqm2hp-g0-1042939.pdf?src-supplier=Digikey, ComponentLink6Description=https://datasheet.ciiva.com/8510/l0075s0104lqm2hp-g0-8510490.pdf?src-supplier=Avnet, ComponentLink6URL=https://datasheet.ciiva.com/8510/l0075s0104lqm2hp-g0-8510490.pdf?src-supplier=Avnet, Core Material=Ferrite, DC Current=1.5A, Depth=2.2mm, ESR=88mR, Height=1.2mm, Height - Seated (Max)=0.039inch, Item Type=Inductor, Lead Free="Lead Free", Length=2.5mm, Manufacturer Part Number=LQM2HPN1R5MG0L, Max DC Current=1.5A, Military Standard=Not, Mounting Technology="Surface Mount", Package=1008, Packaging="Tape and Reel", Pricing="1=0.21, 10=0.171, 25=0.1576, 50=0.1444, 100=0.1274, 250=0.12344, 500=0.11032, 1000=0.0893 (USD)", Radiation Hardening=No, Reach SVHC Compliant=No, RMS Current (Irms)=1.5A, RoHS=Yes, RoHS Compliant=Yes, Series=LQM2HP_G0, Shielding=Shielded, Stock=55189, Supplier=Digikey, Termination=SMD/SMT, Tolerance=20%, Width=0.079inch
L4 L5: library part MCL1608S100MT, "50mA 10uH ±20% 1.17Ω 0603 Inductors (SMD) ROHS", LCSC Part Number=C51942, Manufacturer=SUNLORD, ComponentLink1Description=LCSC, ComponentLink1URL=https://www.lcsc.com/product-detail/Inductors-SMD_Sunlord-MCL1608S100MT_C51942.html, Manufacturer Part Number=MCL1608S100MT
LED1 LED2: library part 16-213/GHC-YR1S1/3T, "Green 520~535nm 0402 Light Emitting Diodes (LED) RoHS", LCSC Part Number=C74338, Manufacturer="Everlight Elec", Package=0402, ComponentLink1Description=LCSC, ComponentLink1URL=https://www.lcsc.com/product-detail/Light-Emitting-Diodes-LED_Everlight-Elec-16-213-GHC-YR1S1-3T_C74338.html, Dominant Wavelength / Coordinate rank=520~535nm, Illumination Color=Green, Item Type=LED, Luminous Intensity (IF=20mA)=112~285mcd, Manufacturer Part Number=16-213/GHC-YR1S1/3T, Mounting Type="Surface Mount"
P1 P2 P3 P4 P5 P6 P7 P8 P9 P10 P11 P12 P13 P14 P15 P16: "Test Point ON", Item Type="TEST POINT"
R1 R6 R24 R31 R32 R33: library part RC0603FR-071KL, "RES SMD 1K OHM 1% 1/10W 0603", Case Code (Imperial)=0603, Case Code (Metric)=1608, LCSC Part Number=C22548, Manufacturer=Yageo, Max Operating Temperature=155°C, Min Operating Temperature=-55°C, Power Rating=100mW, Resistance=1kR, Supplier Part Number 1=311-1.00KHRDKR-ND, Temperature Coefficient=100ppm/°C, Tolerance=1%, Voltage Rating=50V, Case/Package=0603, ComponentLink1Description=https://www.verical.com/server-webapp/html/getDatasheet?partID=409289&src-supplier=Verical, ComponentLink1URL=https://www.verical.com/server-webapp/html/getDatasheet?partID=409289&src-supplier=Verical, ComponentLink2Description=http://documents.rs-components.com/techlib://itc_doclist_GB.htm?stockno=5048928&src-supplier=RSComponents, ComponentLink2URL=http://documents.rs-components.com/techlib://itc_doclist_GB.htm?stockno=5048928&src-supplier=RSComponents, ComponentLink3Description=http://www.yageo.com/documents/recent/PYu-RC0603_51_RoHS_L_4.pdf?src-supplier=Avnet+Europe, ComponentLink3URL=http://www.yageo.com/documents/recent/PYu-RC0603_51_RoHS_L_4.pdf?src-supplier=Avnet+Europe, ComponentLink4Description=http://www.farnell.com/datasheets/2167052.pdf?src-supplier=Element14, ComponentLink4URL=http://www.farnell.com/datasheets/2167052.pdf?src-supplier=Element14, ComponentLink5Description=http://www.farnell.com/datasheets/1868787.pdf?src-supplier=Element14, ComponentLink5URL=http://www.farnell.com/datasheets/1868787.pdf?src-supplier=Element14, ComponentLink6Description=http://www.yageo.com/documents/recent/PYu-RC_Group_51_RoHS_L_2.pdf?src-supplier=Avnet, ComponentLink6URL=http://www.yageo.com/documents/recent/PYu-RC_Group_51_RoHS_L_2.pdf?src-supplier=Avnet, ComponentLink7Description=https://www.verical.com/server-webapp/html/getDatasheet?partID=404327&src-supplier=Verical, ComponentLink7URL=https://www.verical.com/server-webapp/html/getDatasheet?partID=404327&src-supplier=Verical, ComponentLink8Description=http://www.farnell.com/datasheets/443971.pdf?src-supplier=Element14, ComponentLink8URL=http://www.farnell.com/datasheets/443971.pdf?src-supplier=Element14, Composition="Thick Film", Contact Plating=Tin,Matte, Depth=0.8mm, Height=0.45mm, Item Type=Resistor, Lead Free="Lead Free", Length=1.6mm, Manufacturer Part Number=RC0603FR-071KL, Military Standard=Not, Packaging="Tape and Reel", Pricing 1="1=0.1, 10=0.023, 100=0.0094, 1000=0.0042, 2500=0.0037 (USD)", Radiation Hardening=No, REACH SVHC="No SVHC", Stock 1=21472395, Supplier 1=Digi-Key, Termination=SMD/SMT
R2: library part 0603WAF2003T5E, "100mW Thick Film Resistors 75V ±100ppm/℃ ±1% 200kΩ 0603 Chip Resistor - Surface Mount ROHS", LCSC Part Number=C25811, Manufacturer="UNI-ROYAL(Uniroyal Elec)", Package=0603, ComponentLink1Description=LCSC, ComponentLink1URL=https://www.lcsc.com/product-detail/Chip-Resistor-Surface-Mount_UNI-ROYAL-Uniroyal-Elec-0603WAF2003T5E_C25811.html, Item Type=Resistor, Manufacturer Part Number=0603WAF2003T5E
R3: library part 0603WAF6802T5E, "100mW Thick Film Resistors 75V ±100ppm/℃ ±1% 68kΩ 0603 Chip Resistor - Surface Mount ROHS", LCSC Part Number=C23231, Manufacturer="UNI-ROYAL(Uniroyal Elec)", Package=0603, ComponentLink1Description=LCSC, ComponentLink1URL=https://www.lcsc.com/product-detail/Chip-Resistor-Surface-Mount_UNI-ROYAL-Uniroyal-Elec-0603WAF6802T5E_C23231.html, Item Type=Resistor, Manufacturer Part Number=0603WAF6802T5E
R4 R8: library part 0603WAF1003T5E, "100mW Thick Film Resistors 75V ±100ppm/℃ ±1% 100kΩ 0603 Chip Resistor - Surface Mount ROHS", LCSC Part Number=C25803, Manufacturer=UNI-ROYAL, Package=0603, ComponentLink1Description=LCSC, ComponentLink1URL=https://www.lcsc.com/product-detail/Chip-Resistor-Surface-Mount_UNI-ROYAL-Uniroyal-Elec-0603WAF1003T5E_C25803.html, Item Type=Resistor, Manufacturer Part Number=0603WAF1003T5E
R5: library part FRC0603F1502TS, "100mW Thick Film Resistors 75V ±100ppm/℃ ±1% 15kΩ 0603 Chip Resistor - Surface Mount ROHS", LCSC Part Number=C2906995, Manufacturer=FOJAN, Package=0603, ComponentLink1Description=LCSC, ComponentLink1URL=https://www.lcsc.com/product-detail/Chip-Resistor-Surface-Mount_FOJAN-FRC0603F1502TS_C2906995.html, Item Type=Resistor, Manufacturer Part Number=FRC0603F1502TS
R7: library part 0603WAF1203T5E, "100mW Thick Film Resistors 75V ±100ppm/℃ ±1% 120kΩ 0603 Chip Resistor - Surface Mount ROHS", LCSC Part Number=C25808, Manufacturer="UNI-ROYAL(Uniroyal Elec)", Package=0603, ComponentLink1Description=LCSC, ComponentLink1URL=https://www.lcsc.com/product-detail/Chip-Resistor-Surface-Mount_UNI-ROYAL-Uniroyal-Elec-0603WAF1203T5E_C25808.html, Item Type=Resistor, Manufacturer Part Number=0603WAF1203T5E
R9 R10: library part RC0603JR-070RL, "RES 0 OHM JUMPER 1/10W 0603", Case Code (Imperial)=0603, Case Code (Metric)=1608, LCSC Part Number=C95177, Manufacturer=Yageo, Max Operating Temperature=155°C, Max Power Dissipation=100mW, Min Operating Temperature=-55°C, Package Quantity=5000, Resistance=0mR, Resistance Tolerance=5%, Resistor Type="Thick Film", Supplier Part Number 1=311-0.0GRCT-ND, Temperature Coefficient=200ppm/°C, Tolerance=1%, Voltage Rating=50V, Case/Package=0603, Category="Chip SMD Resistors", Construction=Rectangular, Contact Plating=Tin,Matte, Depth=0.8mm, Features="Moisture Resistant", Height=0.45mm, Item Type=Resistor, Lead Free="Lead Free", Length=1.6mm, Manufacturer Part Number=RC0603JR-070RL, Military Standard=Not, Number of Pins=2, Number of Terminations=2, Packaging="Tape and Reel", Power Rating=100mW, Pricing 1="1=0.10000, 10=0.01700, 25=0.01240, 50=0.00960, 100=0.00700, 250=0.00536, 500=0.00430, 1000=0.00316 (USD)", Radiation Hardening=No, Reach SVHC Compliant="No SVHC", RoHS=Yes, RoHS Compliant=Yes, Series=RC, Size Code=0603, Stock 1=18081776, Supplier 1=Digi-Key, Technology="THICK FILM", Termination=SMD/SMT, Voltage Rating (DC)=50V, Width=0.8mm
R11: library part 0603WAF1004T5E, "100mW Thick Film Resistors ±100ppm/℃ ±1% 1MΩ 0603 Chip Resistor - Surface Mount ROHS", LCSC Part Number=C22935, Manufacturer="UNI-ROYAL(Uniroyal Elec)", Package=0603, Item Type=Resistor, Manfacturer Part Number=0603WAF1004T5E
R12 R13: library part 0603WAF5101T5E, "100mW Thick Film Resistors 75V ±100ppm/℃ ±1% 5.1kΩ 0603 Chip Resistor - Surface Mount ROHS", LCSC Part Number=C23186, Manufacturer=UNI-ROYAL, ComponentLink1Description=LCSC, ComponentLink1URL=https://www.lcsc.com/product-detail/Chip-Resistor-Surface-Mount_UNI-ROYAL-Uniroyal-Elec-0603WAF5101T5E_C23186.html, Footpint=0603, Item Type=Resistor, Manufacturer Part Number=0603WAF5101T5E
R14 R15 R16 R21 R22 R23 R25 R26 R34 R35: library part 0603WAF1002T5E, "100mW Thick Film Resistors 75V ±100ppm/℃ ±1% 10kΩ 0603 Chip Resistor - Surface Mount ROHS", LCSC Part Number=C25804, Manufacturer="UNI-ROYAL(Uniroyal Elec)", Package=0603, ComponentLink1Description=LCSC, ComponentLink1URL=https://www.lcsc.com/product-detail/Chip-Resistor-Surface-Mount_UNI-ROYAL-Uniroyal-Elec-0603WAF1002T5E_C25804.html, Item Type=Resistor, Manufacturer Part Number=0603WAF1002T5E
R17 R18: library part 0603WAF220JT5E, "100mW Thick Film Resistors 75V ±100ppm/℃ ±1% 22Ω 0603 Chip Resistor - Surface Mount ROHS", LCSC Part Number=C23345, Manufacturer="UNI-ROYAL(Uniroyal Elec)", ComponentLink1Description=LCSC, ComponentLink1URL=https://www.lcsc.com/product-detail/Chip-Resistor-Surface-Mount_UNI-ROYAL-Uniroyal-Elec-0603WAF220JT5E_C23345.html, Item Type=Resistor, Manufacturer Part Number=0603WAF220JT5E
R27 R29 R30: library part RC0603JR-0747KL, "RES 47K OHM 5% 1/10W 0603", Case Code (Imperial)=0603, Case Code (Metric)=1608, LCSC Part Number=C127447, Manufacturer=Yageo, Max Operating Temperature=155°C, Max Power Dissipation=100mW, Min Operating Temperature=-55°C, Package Quantity=5000, Resistance=47kR, Resistance Tolerance=1%, Resistor Type="Thick Film", Temperature Coefficient=100ppm/°C, Tolerance=5%, Voltage Rating=50V, Case/Package=0603, Category="Chip SMD Resistors", ComponentLink1Description=http://www.farnell.com/datasheets/443971.pdf, ComponentLink1URL=http://www.farnell.com/datasheets/443971.pdf, ComponentLink2Description=http://www.mouser.com/catalog/specsheets/RC0603.pdf, ComponentLink2URL=http://www.mouser.com/catalog/specsheets/RC0603.pdf, ComponentLink3Description=https://datasheet.ciiva.com/46395/443971-46395003.pdf?src-supplier=Element14, ComponentLink3URL=https://datasheet.ciiva.com/46395/443971-46395003.pdf?src-supplier=Element14, ComponentLink4Description=https://datasheet.ciiva.com/12558/rc0603-272842-12558744.pdf?src-supplier=Mouser, ComponentLink4URL=https://datasheet.ciiva.com/12558/rc0603-272842-12558744.pdf?src-supplier=Mouser, Composition="Thick Film", Construction=Rectangular, Depth=0.8mm, Features="Moisture Resistant", Height=0.45mm, Lead Free="Lead Free", Length=1.6mm, Manufacturer Part Number=RC0603JR-0747KL, Military Standard=Not, Number of Pins=2, Number of Terminations=2, Packaging="Tape and Reel", Power Rating=100mW, Pricing 1="5000=0.0025, 10000=0.0022, 25000=0.0019, 1=0.0011, 6000=0.001 (USD)", Pricing 2="1=0.10000, 10=0.02300, 100=0.00930, 1000=0.00417, 2500=0.00362 (USD)", REACH SVHC="No SVHC", RoHS=Yes, RoHS Compliant=Yes, Series=RC, Size Code=0603, Stock 1=599135, Stock 2=1087850, Supplier 1=Arrow, Supplier 2=Digi-Key, Supplier Part Number 1=RC0603JR-0747KL, Supplier Part Number 2=311-30.0KHRCT-ND, Termination=SMD/SMT, Voltage Rating (DC)=50V, Width=0.8mm
R28: library part RT0603BRE072KL, "RES SMD 2K OHM 0.1% 1/10W 0603", Case Code (Imperial)=0603, Case Code (Metric)=1608, LCSC Part Number=C136954, Manufacturer=Yageo, Max Operating Temperature=155°C, Max Power Dissipation=100mW, Min Operating Temperature=-55°C, Package Quantity=5000, Resistance=2kR, Resistor Type="Thin Film", Supplier Part Number 1=8298309, Temperature Coefficient=50ppm/°C, Tolerance=0.1%, Voltage Rating (DC)=50V, Case/Package=0603, Category="Chip SMD Resistors", ComponentLink1Description=https://datasheet.ciiva.com/2584/pyu-rt-1-to-0-05-rohs-l-5-2584417.pdf?src-supplier=Digi-Key, ComponentLink1URL=https://datasheet.ciiva.com/2584/pyu-rt-1-to-0-05-rohs-l-5-2584417.pdf?src-supplier=Digi-Key, Construction=Rectangular, Depth=0.8mm, Features="Moisture Resistant", Height=0.022inch, Item Type=Resistor, Lead Free="Lead Free", Length=0.063inch, Manufacturer Part Number=RT0603BRE072KL, Military Standard=Not, Number of Terminations=2, Packaging="Tape and Reel", Power Rating=100mW, Pricing 1="5000=0.03240, 15000=0.03120, 20000=0.03090, 50000=0.02990, 75000=0.02900 (USD)", RoHS=Yes, RoHS Compliant=Yes, Series=RT, Size Code=0603, Stock 1=85000, Supplier 1="Future Electronics", Width=0.031inch
SB1: "Solder Bridge ON", Manufacturer Part Number="Solder Bridge", Item Type="Solder Bridge"